# Altium PCB PCB_GTV3.3.PcbDoc (part 7 of 11)
Units mil, origin at the board's own origin, x right, y up, seen from the top; angles counter-clockwise.
Board outline 8070.87 x 4881.89 mil, 4 copper layers (Top Layer, GND, PWR, Bottom Layer), stack 61.653 mil thick; 464 components, 293 nets, 1458 pads, 748 vias.
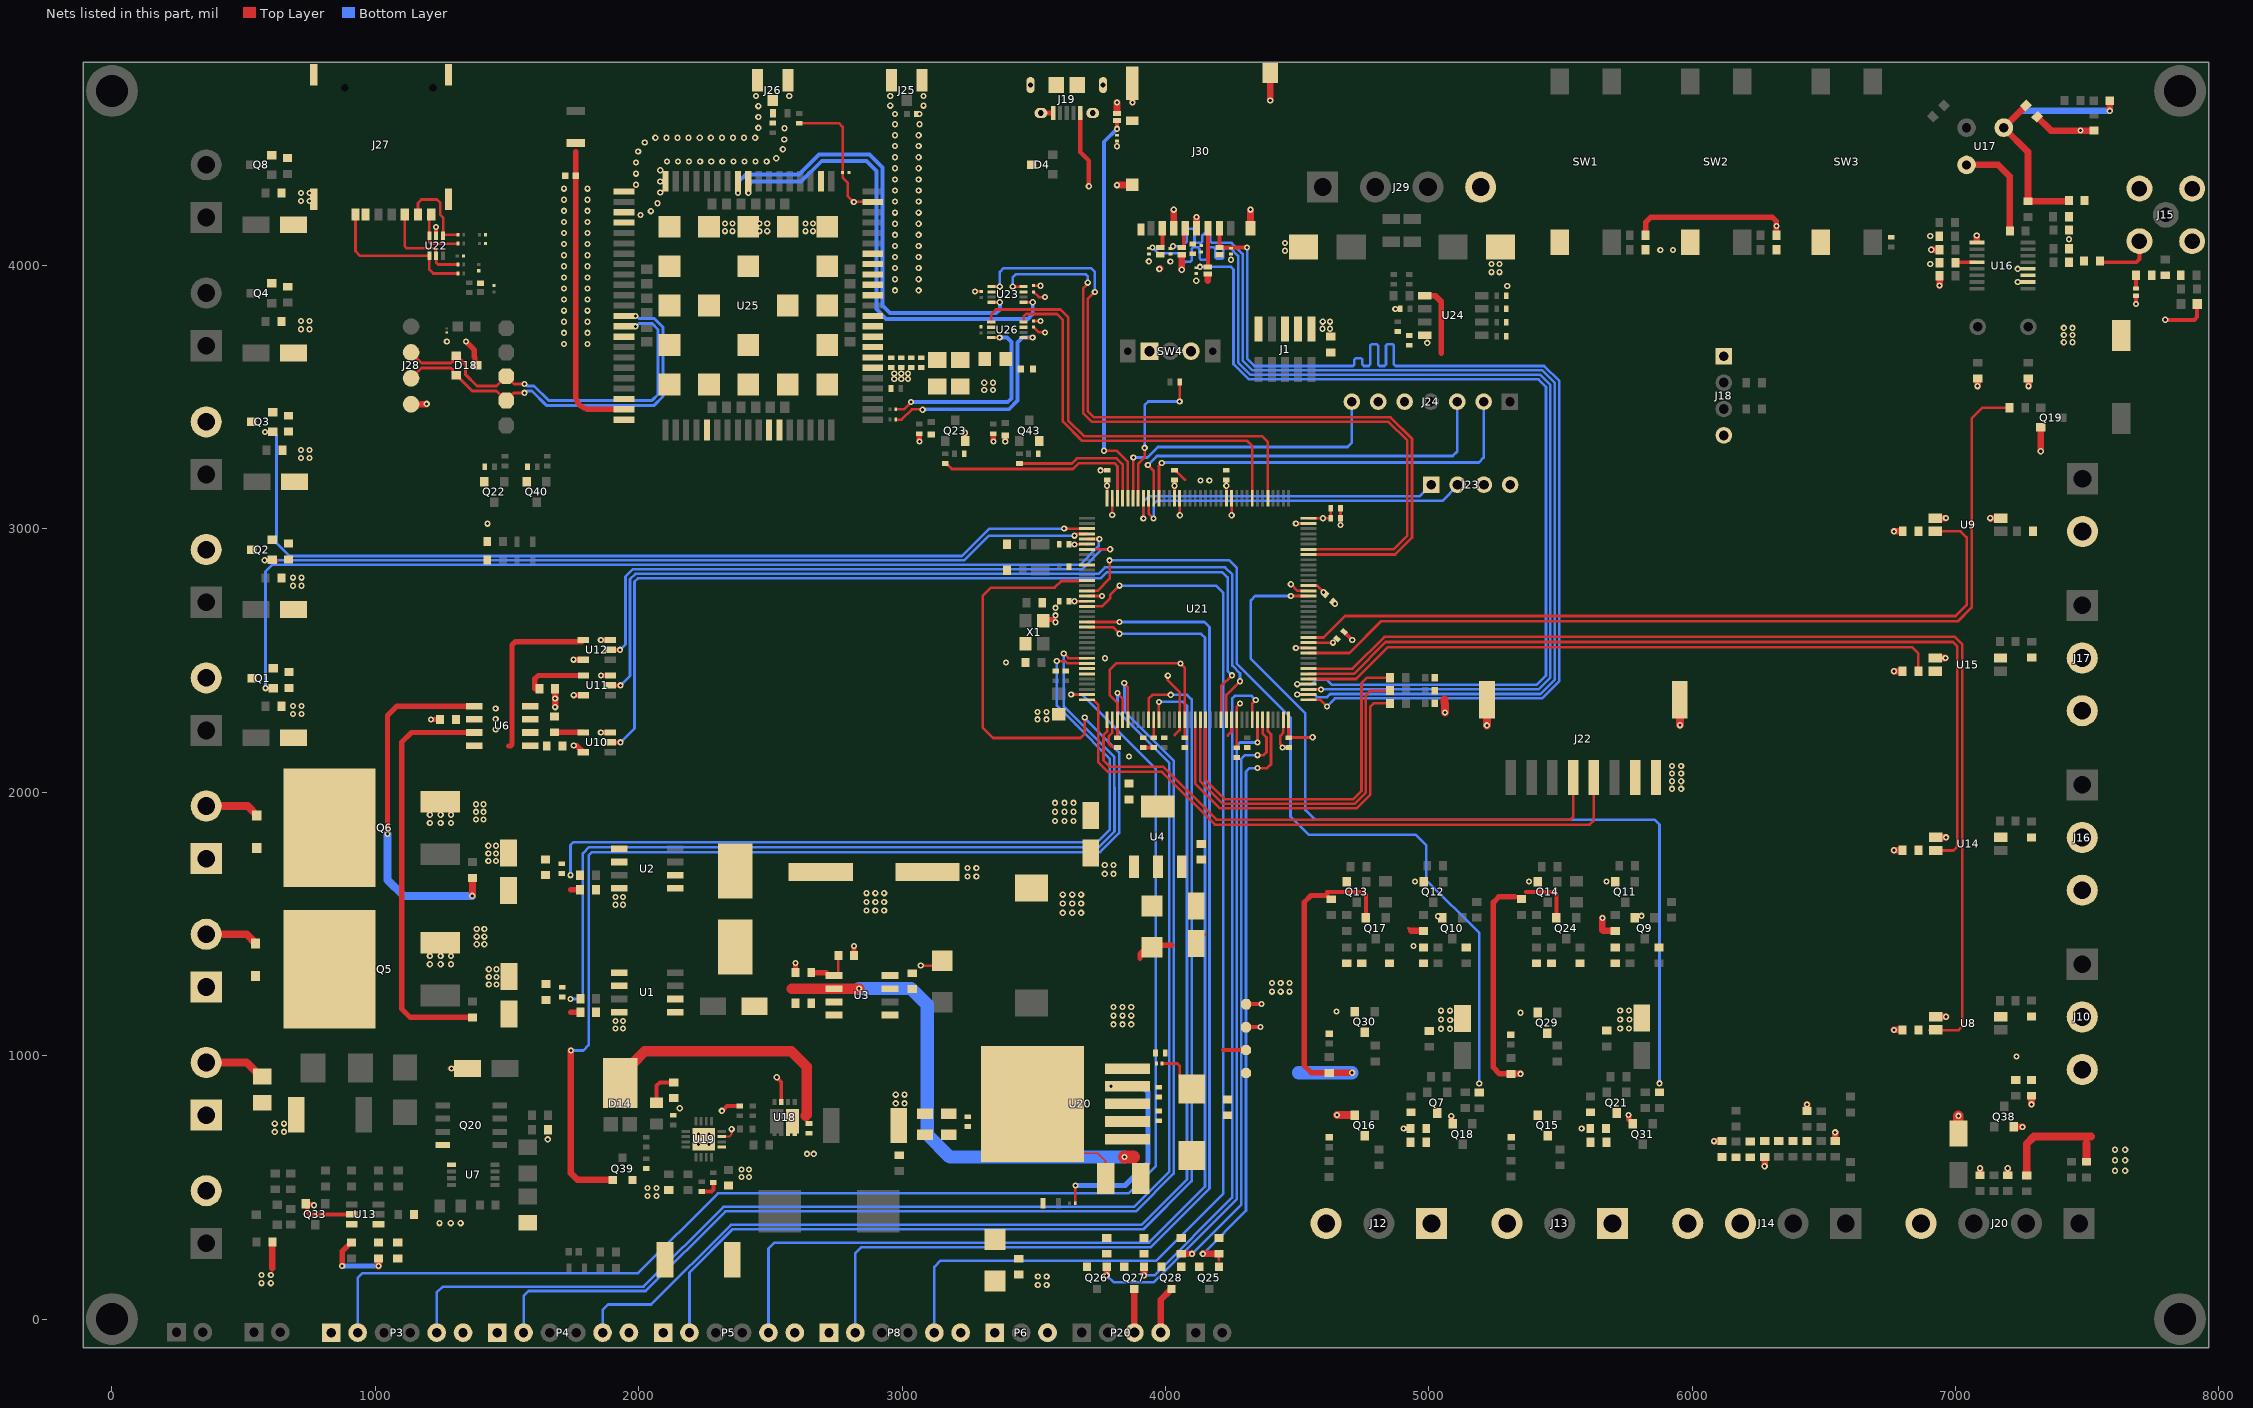
[diagram p5: the nets of this part, all layers, seen from the top]

## Part data (continued)
U3: "1.5-A boost, buck, inverting switching regulator, operation from 0°C to 70°C 8-SOIC 0 to 70", Case/Package=D, Manufacturer="Texas Instruments", Max Input Voltage=40V, Max Operating Temperature=70°C, Max Output Current=750mA, Min Input Voltage=3V, Min Operating Temperature=0°C, Min Output Voltage=1.55V, Output Current=1.5A, Package Quantity=1, Quiescent Current=4mA, Supplier Part Number 1=296-17765-1-ND, Switching Frequency=100kHz, Category="Power Supply Modules", ComponentLink1Description=https://datasheet.ciiva.com/7408/1862376-7408060.pdf?src-supplier=Newark, ComponentLink1URL=https://datasheet.ciiva.com/7408/1862376-7408060.pdf?src-supplier=Newark, ComponentLink2Description=https://datasheet.ciiva.com/2025/mc33063a-2025162.pdf?src-supplier=Digi-Key, ComponentLink2URL=https://datasheet.ciiva.com/2025/mc33063a-2025162.pdf?src-supplier=Digi-Key, ComponentLink3Description=https://datasheet.ciiva.com/2025/mc33063a-2025161.pdf?src-supplier=Digi-Key, ComponentLink3URL=https://datasheet.ciiva.com/2025/mc33063a-2025161.pdf?src-supplier=Digi-Key, ComponentLink4Description=https://datasheet.ciiva.com/2025/mc33063a-2025163.pdf?src-supplier=Digi-Key, ComponentLink4URL=https://datasheet.ciiva.com/2025/mc33063a-2025163.pdf?src-supplier=Digi-Key, Contact Plating=Gold, Lead Free="Lead Free", Manufacturer Part Number=MC34063ADR, Max Output Voltage=40V, Number of Outputs=1, Number of Pins=8, Output Type=Adjustable, Output Voltage=40V, Packaging="Tape and Reel", Pricing 1="1=0.78000, 10=0.68400, 25=0.64240, 100=0.52420, 250=0.48688, 500=0.41438, 1000=0.34206 (USD)", Radiation Hardening=No, REACH SVHC="No SVHC", RoHS=Yes, RoHS Compliant=Yes, Stock 1=17204, Supplier 1=Digi-Key, Synchronous Rectifier=No, Termination=SMD/SMT, Topology=Flyback,SEPIC, Weight=0.002561oz
U4: "IC REG LINEAR 3.3V 1A SOT223", Case/Package=SOT-223, Current Rating=1A, Dropout Voltage=1.2V, Manufacturer="Texas Instruments", Max Input Voltage=15V, Max Operating Temperature=125°C, Min Input Voltage=2.5V, Min Operating Temperature=0°C, Nominal Output Voltage=3.3V, Nominal Supply Current=5mA, Output Voltage Accuracy=1%, Package Quantity=1000, Quiescent Current=10mA, Accuracy=1%, Category="Voltage Regulators - Linear", ComponentLink1Description=https://datasheet.ciiva.com/3225/lms8117a-3225472.pdf?src-supplier=Avnet, ComponentLink1URL=https://datasheet.ciiva.com/3225/lms8117a-3225472.pdf?src-supplier=Avnet, ComponentLink2Description=https://datasheet.ciiva.com/2066/lms8117a-2066594.pdf?src-supplier=Digi-Key, ComponentLink2URL=https://datasheet.ciiva.com/2066/lms8117a-2066594.pdf?src-supplier=Digi-Key, ComponentLink3Description=https://datasheet.ciiva.com/2066/lms8117a-2066595.pdf?src-supplier=Digi-Key, ComponentLink3URL=https://datasheet.ciiva.com/2066/lms8117a-2066595.pdf?src-supplier=Digi-Key, ComponentLink4Description=https://datasheet.ciiva.com/2066/lms8117a-2066596.pdf?src-supplier=Digi-Key, ComponentLink4URL=https://datasheet.ciiva.com/2066/lms8117a-2066596.pdf?src-supplier=Digi-Key, ComponentLink5Description=https://datasheet.ciiva.com/3223/lms8117a-3223813.pdf?src-supplier=Avnet, ComponentLink5URL=https://datasheet.ciiva.com/3223/lms8117a-3223813.pdf?src-supplier=Avnet, ComponentLink6Description=https://datasheet.ciiva.com/25979/lms8117a-25979141.pdf?src-supplier=Avnet+Europe, ComponentLink6URL=https://datasheet.ciiva.com/25979/lms8117a-25979141.pdf?src-supplier=Avnet+Europe, ComponentLink7Description=https://datasheet.ciiva.com/46386/1558097-46386039.pdf?src-supplier=Element14, ComponentLink7URL=https://datasheet.ciiva.com/46386/1558097-46386039.pdf?src-supplier=Element14, ComponentLink8Description=https://datasheet.ciiva.com/8042/90386-8042363.pdf?src-supplier=Element14, ComponentLink8URL=https://datasheet.ciiva.com/8042/90386-8042363.pdf?src-supplier=Element14, ComponentLink9Description=https://datasheet.ciiva.com/5697/1558097-5697692.pdf?src-supplier=Farnell, ComponentLink9URL=https://datasheet.ciiva.com/5697/1558097-5697692.pdf?src-supplier=Farnell, Contact Plating=Tin,Matte, Height=1.6mm, Lead Free="Lead Free", Length=6.5mm, Manufacturer Part Number=LMS8117AMP-3.3/NOPB, Max Output Current=1A, Mount="Surface Mount", Number of Outputs=1, Number of Pins=4, Output Current=1A, Output Type=Fixed, Output Voltage=3.3V, Packaging="Tape and Reel", Polarity=Positive, Pricing 1="1=1.18760, 10=1.01800, 100=0.77540, 250=0.68460, 500=0.64870, 1000=0.59270 (USD)", Radiation Hardening=No, REACH SVHC="No SVHC", RoHS=Yes, RoHS Compliant=Yes, Stock 1=843, Supplier 1="Arrow Electronics", Supplier Part Number 1=LMS8117AMP-3.3/NOPB, Width=3.56mm
U6: "IC GATE DRVR LOW-SIDE 8SOIC", Case/Package=SOIC, Manufacturer="ON Semiconductor", Max Operating Temperature=140°C, Max Output Current=5A, Max Supply Current=3mA, Max Supply Voltage=20V, Min Operating Temperature=-40°C, Min Supply Voltage=4.5V, Supplier Part Number 1=NCP81071ADR2GOSDKR-ND, Category="Gate Drivers", Channel Type=Independent, ComponentLink1Description=https://datasheet.ciiva.com/48511/ncp81071-d-48511319.pdf?src-supplier=Avnet, ComponentLink1URL=https://datasheet.ciiva.com/48511/ncp81071-d-48511319.pdf?src-supplier=Avnet, Height=1.5mm, Lead Free="Lead Free", Length=5mm, Manufacturer Part Number=NCP81071ADR2G, Mount="Surface Mount", Number of Drivers=2, Number of Outputs=2, Number of Pins=8, Packaging="Cut Tape", Pricing 1="1=1.40000, 10=1.25100, 25=1.18720, 100=0.97520, 250=0.91160, 500=0.80560, 1000=0.70000 (USD)", REACH SVHC="No SVHC", RoHS=Yes, RoHS Compliant=Yes, Supplier 1=Digi-Key, Width=4mm
U7: "IC OR CTRLR N+1 8MSOP", Case/Package=MSOP, Manufacturer="Analog Devices / Linear Technology", Max Operating Temperature=70°C, Max Output Current=180mA, Max Supply Voltage=80V, Min Operating Temperature=0°C, Min Supply Voltage=4V, Operating Supply Current=150uA, Package Quantity=50, Supplier Part Number 1=584-LTC4359CMS8#PBF, Category="Power Management ICs", ComponentLink1Description=https://datasheet.ciiva.com/6609/4359fb-6609306.pdf?src-supplier=Digi-Key, ComponentLink1URL=https://datasheet.ciiva.com/6609/4359fb-6609306.pdf?src-supplier=Digi-Key, Lead Free="Lead Free", Manufacturer Part Number=LTC4359CMS8#PBF, Number of Drivers=1, Number of Pins=8, Packaging=Rail/Tube, Pricing 1="1=4.95000, 10=4.44000, 50=4.19000, 100=3.63000, 1000=3.09000, 10000=3.09000 (USD)", RoHS=Yes, Stock 1=57, Supplier 1=Mouser, Turn-Off Delay Time=300ns, Turn-On Delay Time=200us
U8 U9 U14 U15: "TransistorOptocouplers DC 1 2500Vrms SOP-4_P1.27 Optocouplers RoHS", Case/Package=SOIC, Collector Emitter Saturation Voltage=300mV, Forward Voltage=1.2V, Manufacturer=CEL, Max Collector Current=30mA, Max Operating Temperature=100°C, Max Output Voltage=80V, Max Power Dissipation=120mW, Min Operating Temperature=-55°C, Package Quantity=1, Supplier Part Number 1=PS2801C-1-F3-ACT-ND, Collector Emitter Voltage (VCEO)=300mV, ComponentLink1Description=http://www.cel.com/pdf/datasheets/PS2801C-1,PS2801C-4.pdf?src-supplier=Digi-Key, ComponentLink1URL=http://www.cel.com/pdf/datasheets/PS2801C-1,PS2801C-4.pdf?src-supplier=Digi-Key, ComponentLink2Description=http://www.cel.com/pdf/datasheets/how_to_order_optos.pdf?src-supplier=Digi-Key, ComponentLink2URL=http://www.cel.com/pdf/datasheets/how_to_order_optos.pdf?src-supplier=Digi-Key, ComponentLink3Description=http://datasheet.iiic.cc/cel/PS2801C-1-F3-A.pdf?src-supplier=IIIC, ComponentLink3URL=http://datasheet.iiic.cc/cel/PS2801C-1-F3-A.pdf?src-supplier=IIIC, Lead Free="Lead Free", Manufacturer Part Number=PS2801C-1-F3-A, Mount="Surface Mount", Number of Channels=1, Number of Pins=4, Output Current per Channel=30mA, Packaging="Tape and Reel", Pricing 1="1=0.77, 10=0.595, 100=0.3825 (USD)", Stock 1=399, Supplier 1=Digi-Key
U10 U11 U12: "IC BUF NON-INVERT 5.5V SOT23-5", Case/Package=SOT-23-5, High Level Output Current=-8mA, Low Level Output Current=8mA, Manufacturer="Texas Instruments", Max Operating Temperature=125°C, Max Supply Voltage=5.5V, Min Operating Temperature=-40°C, Min Supply Voltage=1.6V, Package Quantity=3000, Quiescent Current=1uA, Supplier Part Number 1=296-37176-6-ND, ComponentLink1Description=http://www.ti.com/lit/pdf/sdyu001?src-supplier=Digi-Key, ComponentLink1URL=http://www.ti.com/lit/pdf/sdyu001?src-supplier=Digi-Key, ComponentLink2Description=http://www.ti.com/lit/ds/symlink/sn74lv1t34.pdf?src-supplier=Avnet, ComponentLink2URL=http://www.ti.com/lit/ds/symlink/sn74lv1t34.pdf?src-supplier=Avnet, Lead Free="Lead Free", Logic Function=Buffer,Inverting, Manufacturer Part Number=SN74LV1T34DBVR, Mount="Surface Mount", Number of Bits=1, Number of Bits per Element=1, Number of Channels=1, Number of Elements=1, Number of Input Lines=1, Number of Inputs=1, Number of Output Lines=1, Number of Outputs=1, Number of Pins=5, Operating Supply Current=8mA, Packaging="Tape and Reel", Polarity=Non-Inverting, Pricing 1="1=0.43, 10=0.349, 25=0.3192, 100=0.2374, 250=0.2152, 500=0.17808, 1000=0.13356 (USD)", Propagation Delay=15.5ns, Radiation Hardening=No, REACH SVHC="No SVHC", RoHS Compliant=Yes, Stock 1=37360, Supplier 1=Digi-Key, Weight=0.000353oz
U13: "SOT-23-6 Comparators ROHS", Case/Package=SOT, Manufacturer="Texas Instruments", Max Operating Temperature=125°C, Max Supply Voltage=18V, Min Operating Temperature=-40°C, Min Supply Voltage=1.8V, Nominal Supply Current=7uA, Number of Voltages Monitored=2, Operating Supply Current=5.5uA, Package Quantity=3000, Quiescent Current=11uA, Supplier Part Number 1=595-TPS3700DDCR, Undervoltage Threshold=1.7V, Category=Comparators, ComponentLink1Description=https://datasheet.ciiva.com/15106/getdatasheetpartid-496993-15106246.pdf?src-supplier=Verical, ComponentLink1URL=https://datasheet.ciiva.com/15106/getdatasheetpartid-496993-15106246.pdf?src-supplier=Verical, ComponentLink2Description=https://datasheet.ciiva.com/22693/1882693-22693543.pdf?src-supplier=Element14, ComponentLink2URL=https://datasheet.ciiva.com/22693/1882693-22693543.pdf?src-supplier=Element14, ComponentLink3Description=https://datasheet.ciiva.com/6625/tps3700-6625126.pdf?src-supplier=Digi-Key, ComponentLink3URL=https://datasheet.ciiva.com/6625/tps3700-6625126.pdf?src-supplier=Digi-Key, ComponentLink4Description=https://datasheet.ciiva.com/6625/tps3700-6625125.pdf?src-supplier=Digi-Key, ComponentLink4URL=https://datasheet.ciiva.com/6625/tps3700-6625125.pdf?src-supplier=Digi-Key, ComponentLink5Description=https://datasheet.ciiva.com/6625/tps3700-6625129.pdf?src-supplier=Digi-Key, ComponentLink5URL=https://datasheet.ciiva.com/6625/tps3700-6625129.pdf?src-supplier=Digi-Key, ComponentLink6Description=https://datasheet.ciiva.com/14204/tps3700-14204199.pdf?src-supplier=Avnet, ComponentLink6URL=https://datasheet.ciiva.com/14204/tps3700-14204199.pdf?src-supplier=Avnet, Hysteresis=5.5mV, Lead Free="Lead Free", Manufacturer Part Number=TPS3700DDCR, Mount="Surface Mount", Number of Channels=1, Number of Elements=2, Number of Pins=6, Packaging="Tape and Reel", Pricing 1="1=2.75000, 10=2.48000, 25=2.34000, 50=2.34000, 100=2.00000, 250=1.87000, 500=1.64000, 1000=1.36000, 3000=1.35000, 10000=1.35000 (USD)", Propagation Delay=29us, Radiation Hardening=No, REACH SVHC="No SVHC", RoHS=Yes, RoHS Compliant=Yes, Series=TPS3700, Supplier 1=Mouser, Supply Current=7uA, Watchdog Timer=No
U16: "RF RX ASK/OOK 300-450MHZ 16QSOP", Case/Package=QSOP, Current - Receiving=6mA, Frequency=450MHz, Manufacturer=Microchip, Max Operating Temperature=105°C, Max Supply Voltage=3.6V, Min Frequency=300MHz, Min Operating Temperature=-40°C, Min Supply Voltage=3V, Nominal Supply Current=4.3mA, Operating Frequency="300 MHz to 450 MHz", Package Quantity=98, Bandwidth=330kHz, Category="Interface ICs", ComponentLink1Description=https://datasheet.ciiva.com/2798/micrf220-2798468.pdf?src-supplier=Digi-Key, ComponentLink1URL=https://datasheet.ciiva.com/2798/micrf220-2798468.pdf?src-supplier=Digi-Key, ComponentLink2Description=https://datasheet.ciiva.com/30475/0900766b81133813-30475820.pdf?src-supplier=RSComponents, ComponentLink2URL=https://datasheet.ciiva.com/30475/0900766b81133813-30475820.pdf?src-supplier=RSComponents, ComponentLink3Description=https://datasheet.ciiva.com/1164/micrf220-1164232.pdf?src-supplier=Element14, ComponentLink3URL=https://datasheet.ciiva.com/1164/micrf220-1164232.pdf?src-supplier=Element14, Data Rate=20Kbps, Depth=3.91mm, Height=1.47mm, Lead Free="Lead Free", Length=4.9mm, Manufacturer Part Number=MICRF220AYQS, Max Frequency=450MHz, Mount="Surface Mount", Number of Pins=16, Packaging=Rail/Tube, Pricing 1="1=2.15000 (USD)", Radiation Hardening=No, REACH SVHC="No SVHC", RoHS=Yes, RoHS Compliant=Yes, Sensitivity=-112.5dBm, Series=QwikRadio®, Stock 1=5131, Supplier 1="Arrow Electronics", Supplier Part Number 1=MICRF220AYQS, Supply Current=4.3mA, Width=3.91mm
U17: "Through Hole Biometric Sensors ROHS", Manufacturer=Senba, ComponentLink1Description=LCSC, ComponentLink1URL=https://www.lcsc.com/product-detail/Biometric-Sensors_Senba-Sensing-Tech-AS312_C90465.html, Manufacturer Part Number=AS312
U18: "40V 20A 17mΩ@10V,10A 21W 1.6V@250uA 72pF@20V 2 N-Channel 1.05nF@20V 11nC@10V +150℃@(Tj) PDFN3x3", Manufacturer="ALLPOWER(ShenZhen Quan Li Semiconductor)", ComponentLink1Description=LCSC, ComponentLink1URL=https://lcsc.com/product-detail/MOSFETs_ALLPOWER-ShenZhen-Quan-Li-Semiconductor-AP4008QD_C2828588.html, Manufacturer Part Number=AP4008QD
U19: "IC BATT CHG MULTI-CHEM 16VQFN", LCSC Part Number=C53712, Manufacturer="Texas Instruments", Category="Battery Management", ComponentLink1Description=https://datasheet.ciiva.com/15115/getdatasheetpartid-517726-15115144.pdf?src-supplier=Verical, ComponentLink1URL=https://datasheet.ciiva.com/15115/getdatasheetpartid-517726-15115144.pdf?src-supplier=Verical, ComponentLink2Description=https://datasheet.ciiva.com/1934/bq24650-1934895.pdf?src-supplier=Digi-Key, ComponentLink2URL=https://datasheet.ciiva.com/1934/bq24650-1934895.pdf?src-supplier=Digi-Key, ComponentLink3Description=https://datasheet.ciiva.com/3214/bq24650-3214319.pdf?src-supplier=Avnet, ComponentLink3URL=https://datasheet.ciiva.com/3214/bq24650-3214319.pdf?src-supplier=Avnet, Item Type=IC, Manufacturer Part Number=BQ24650RVAR, Pricing 1="1=4.95, 10=4.442, 25=4.1996, 100=3.6396, 250=3.453, 500=3.09836, 1000=2.61307 (USD)", RoHS=Yes, Stock 1=8347, Supplier 1=Digi-Key
U20: "IC REG LDO ADJ 3A TO263-5", Case/Package=TO-263, Dropout Voltage=370mV, Input Bias Current=40nA, LCSC Part Number=C11149, Manufacturer=Microchip, Max Input Voltage=26V, Max Operating Temperature=125°C, Max Output Current=3A, Max Output Voltage=25V, Min Input Voltage=2.5V, Min Operating Temperature=-40°C, Min Output Voltage=1.25V, Package Quantity=750, Quiescent Current=35mA, Reference Voltage=1.24V, Supplier Part Number 1=3153683, Accuracy=1%, Category="Voltage Regulators - Linear", ComponentLink1Description=https://datasheet.ciiva.com/23772/1572633-23772885.pdf?src-supplier=Newark, ComponentLink1URL=https://datasheet.ciiva.com/23772/1572633-23772885.pdf?src-supplier=Newark, ComponentLink2Description=https://datasheet.ciiva.com/16296/mic29150-16296190.pdf?src-supplier=Future+Electronics, ComponentLink2URL=https://datasheet.ciiva.com/16296/mic29150-16296190.pdf?src-supplier=Future+Electronics, ComponentLink3Description=https://datasheet.ciiva.com/15200/getdatasheetpartid-143209-15200663.pdf?src-supplier=Verical, ComponentLink3URL=https://datasheet.ciiva.com/15200/getdatasheetpartid-143209-15200663.pdf?src-supplier=Verical, Height=4.59mm, Item Type=IC, Lead Free="Lead Free", Length=10.67mm, Manufacturer Part Number=MIC29302WU-TR, Mount="Surface Mount", Number of Outputs=1, Number of Pins=5, Number of Regulators=1, Output Configuration=Positive, Output Current=3A, Output Type=Adjustable, Output Voltage=26V, Packaging="Tape and Reel", Polarity=Positive, Pricing 1="750=2.12000, 1500=2.09000, 2250=2.07000, 3000=2.06000, 3750=2.02000 (USD)", Radiation Hardening=No, Reach SVHC Compliant=Yes, RoHS=Yes, RoHS Compliant=Yes, Series=-, Supplier 1="Future Electronics", Width=9.17mm
U21: "IC MCU 32BIT 1MB FLASH 144LQFP", Case/Package=LQFP, Clock Frequency=72MHz, LCSC Part Number=C44011, Max Operating Temperature=85°C, Max Power Dissipation=666mW, Max Supply Voltage=3.6V, Min Operating Temperature=-40°C, Min Supply Voltage=2V, Nominal Supply Current=1.9uA, Package Quantity=60, Supplier Part Number=511-STM32F103ZGT6, Category=Microcontrollers, ComponentLink1Description=LCSC, ComponentLink2Description=https://datasheet.ciiva.com/4841/cd00253742-490410-4841544.pdf?src-supplier=Mouser, ComponentLink2URL=https://datasheet.ciiva.com/4841/cd00253742-490410-4841544.pdf?src-supplier=Mouser, ComponentLink3Description=https://datasheet.ciiva.com/5752/cd00253742-5752891.pdf?src-supplier=Farnell, ComponentLink3URL=https://datasheet.ciiva.com/5752/cd00253742-5752891.pdf?src-supplier=Farnell, Core Architecture=ARM, Data Bus Width=32b, Frequency=72MHz, Height=1.45mm, Interface=I2C,SPI,USB,CAN,IrDA,UART,USART,LIN,I2S, Item Type=IC, Lead Free="Lead Free", Length=20.2mm, Memory Format=FLASH, Memory Size=1MB, Number of A/D Converters=3NUMBER, Number of ADC Channels=21, Number of D/A Converters=2NUMBER, Number of I2C Channels=2, Number of I/Os=112, Number of Programmable I/O=112, Number of PWM Channels=6, Number of SPI Channels=3, Number of Timers/Counters=14, Oscillator Type=Internal, Packaging=Tray, Peripherals="POR,PWM,WDT,DMA,Temp Sensor,I2C", Pins=144, Pricing="1=13.7, 10=12.83, 50=11.16, 100=9.99, 1000=8.77, 10000=8.77 (USD)", Radiation Hardening=No, RAM Size=96KB, Reach SVHC Compliant=No, RoHS=Yes, RoHS Compliant=Yes, Series="STM32 F1", Stock=8305, Supplier=Mouser, Watchdog Timer=Yes, Width=20.2mm
U22: "15V 5 Unidirectional 5V SOT-363 ESD Protection Devices ROHS", LCSC Part Number=C5180312, Manufacturer=ElecSuper, Package=SOT-363, ComponentLink1Description=LCSC, ComponentLink1URL=https://www.lcsc.com/product-detail/ESD-Protection-Devices_ElecSuper-SMF05CT1G-ES_C5180312.html, Item Type="ESD Diode", Manufacturer Part Number=SMF05CT1G-ES
U23 U26: "IC TRNSLTR BIDIRECTIONAL US8", Case/Package=VSSOP, High Level Output Current=-20uA, Low Level Output Current=20uA, Manufacturer="Texas Instruments", Max Operating Temperature=85°C, Max Supply Voltage=5.5V, Min Operating Temperature=-40°C, Min Supply Voltage=1.65V, Output Current=50mA, Package Quantity=1, Category="Integrated Circuits (ICs)", ComponentLink1Description=https://datasheet.ciiva.com/4226/sces641b-4226901.pdf?src-supplier=Arrow+Electronics, ComponentLink1URL=https://datasheet.ciiva.com/4226/sces641b-4226901.pdf?src-supplier=Arrow+Electronics, ComponentLink2Description=https://datasheet.ciiva.com/15096/getdatasheetpartid-226009-15096242.pdf?src-supplier=Verical, ComponentLink2URL=https://datasheet.ciiva.com/15096/getdatasheetpartid-226009-15096242.pdf?src-supplier=Verical, ComponentLink3Description=https://datasheet.ciiva.com/14287/txb0102-14287498.pdf?src-supplier=Avnet, ComponentLink3URL=https://datasheet.ciiva.com/14287/txb0102-14287498.pdf?src-supplier=Avnet, ComponentLink4Description=https://datasheet.ciiva.com/14287/txb0102-14287370.pdf?src-supplier=Avnet, ComponentLink4URL=https://datasheet.ciiva.com/14287/txb0102-14287370.pdf?src-supplier=Avnet, ComponentLink5Description=https://datasheet.ciiva.com/6619/txb0102-6619255.pdf?src-supplier=Digi-Key, ComponentLink5URL=https://datasheet.ciiva.com/6619/txb0102-6619255.pdf?src-supplier=Digi-Key, ComponentLink6Description=https://datasheet.ciiva.com/6619/txb0102-6619256.pdf?src-supplier=Digi-Key, ComponentLink6URL=https://datasheet.ciiva.com/6619/txb0102-6619256.pdf?src-supplier=Digi-Key, ComponentLink7Description=https://datasheet.ciiva.com/6619/txb0102-6619257.pdf?src-supplier=Digi-Key, ComponentLink7URL=https://datasheet.ciiva.com/6619/txb0102-6619257.pdf?src-supplier=Digi-Key, Contact Plating=Gold, Data Rate=100Mbps, Height=0.85mm, Lead Free="Lead Free", Length=2.3mm, Logic Function=Translator, Manufacturer Part Number=TXB0102DCUT, Mount="Surface Mount", Number of Bits=2, Number of Channels=2, Number of Inputs=2, Number of Pins=8, Output Type=3-STATE, Packaging="Tape and Reel", Pricing 1="1=0.79330, 10=0.66470, 25=0.65820, 250=0.37450, 500=0.36200, 1000=0.29770, 2500=0.28440 (USD)", Propagation Delay=31ns, Radiation Hardening=No, REACH SVHC="No SVHC", RoHS=Yes, RoHS Compliant=Yes, Series=-, Stock 1=10, Supplier 1="Arrow Electronics", Supplier Part Number 1=TXB0102DCUT, Turn-On Delay Time=7.4ns, Weight=0.000339oz, Width=2mm
U24: "SOP-8 RS-485/RS-422 ICs ROHS", LCSC Part Number=C519086, Manufacturer=HGSEMI, Package=SOP-8, ComponentLink1Description=LCSC, ComponentLink1URL=https://www.lcsc.com/product-detail/RS-485-RS-422-ICs_HGSEMI-SP3485EIM-TR_C519086.html, Item Type=IC, Manufacturer Part Number=SP3485EIM/TR
U25: "RF TXRX MODULE CELLULAR SMD", Manufacturer="SIMCom Wireless Solutions Limited", Package="80-SMD Module", ComponentLink1Description=Digikey, ComponentLink1URL=https://www.digikey.com/en/products/detail/simcom-wireless-solutions-limited/A7672E-FASE/15841437, Item Type="IC Module", Manufacturer Part Number="A7672E (FASE)"
X1: library part XC32M4-8.000-F18LJDT, "8MHz SMD Crystal Resonator 18pF 200Ω ±20ppm ±30ppm -40℃~+85℃ SMD3225-4P Crystals ROHS", Manufacturer=HCI, ComponentLink1Description=LCSC, ComponentLink1URL=https://www.lcsc.com/product-detail/Crystals_HCI-XC32M4-8-000-F18LJDT_C2905353.html, Manufacturer Part Number=XC32M4-8.000-F18LJDT
X2: library part S1C13523ZWFAC, "13.52313MHz In-line passive crystal oscillator 20pF 60Ω ±20ppm ±30ppm -40℃~+85℃ HC-49S-2P Crystals ROHS", LCSC Part Number=C2681243, Manufacturer=JYJE, Package=HC-49S-2P, ComponentLink1Description=LCSC, ComponentLink1URL=https://www.lcsc.com/product-detail/Crystals_JYJE-S1C13523ZWFAC_C2681243.html, Manufacturer Part Number=S1C13523ZWFAC
X3: library part X321532768KGD2SI, "32.768kHz SMD Crystal Resonator 12.5pF ±20ppm -40℃~+85℃ SMD3215-2P Crystals ROHS", Manufacturer="Yangxing Tech", ComponentLink1Description=LCSC, ComponentLink1URL=https://www.lcsc.com/product-detail/Crystals_Yangxing-Tech-X321532768KGD2SI_C620155.html, Manufacturer Part Number=X321532768KGD2SI

## Free pads (board coordinates)
  round 196.85 hole 122.05: MH1(0,0) MH1(0.1,4663.13) MH1(7852.11,-0.1) MH1(7852.21,4663.03)

## Via types
v1: diameter 23.62, hole 11.81, Top Layer to Bottom Layer, tented both sides, 422 vias
v2: diameter 23.62, hole 11.81, Top Layer to Bottom Layer, 326 vias

## Nets (pads, with @x,y where several pads share a name; then routed paths per layer and width w, separated by ;. In a path a pad name is that pad's centre, name@x,y a point inside that pad or via, vN(x,y) a via of type N, cw(c..) or ccw(c..) an arc to the next point about the centre after c; other vN are vias at no path point)
0-10V: R112.1 SB36.1
2V8: C10.1 R143.1 U25.99 | length 523.7
  Top Layer w10: R143.1@2609,4540.54 2759.92,4540.54 2774.27,4526.19 C10.1@2774.27,4353.28 2774.27,4333.85 2793.26,4314.85 2793.26,4264.08 2815.61,4241.74 U25.99@2866.48,4241.74
  other v1: 2816.81,4241.74
3V3: C5.2 C12.1 C23.1 C26.1 C29.1 C30.1 C31.1 C32.1 C33.1 C39.1 C48.1 C49.1 C51.1 C52.1 C75.2 C76.1 C93.1 C95.1 C104.1 C106.1 C107.2 C108.2 C109.1 C110.1 C111.1 C112.1 C114.1 D3.2 J1.1 J24.5 J30.4 L1.1 LED1.1 LED2.1 LED3.1 LED8.1 LS1.1 P1.1 P3.1 P4.1 P5.1 P6.1 P8.1 Q17.2 Q24.2 R18.2 R19.2 R20.2 R23.2 R31.1 R35.2 R43.2 R45.2 R48.2 R49.2 R54.2 R55.2 R57.2 R58.2 R59.2 R60.2 R76.2 R79.2 R93.2 R94.2 R104.2 R106.1 R156.2 R157.2 R158.2 R159.2 R160.2 SW4.1 U4.2 U4.4 U17.1 U21.6 U21.17 U21.39 U21.52 U21.62 U21.72 U21.84 U21.95 U21.108 U21.121 U21.131 U21.144 U23.7 U24.8 U26.7 | length 6364.7
  Top Layer w7: LED8.1@7584.51,4626.4 LED8.1@7585.11,4627
  Top Layer w10: C106.1@3499,3766.19 3519,3746.19 v1(3542.99,3746.19) ; C104.1@3499,3900.19 3519,3880.19 v1(3542.99,3880.19) ; v1(3655.01,2725.56) U21.17@3702.4,2725.56 ; v1(3655.04,2940.73) 3656.41,2942.1 3671.69,2942.1 ; U21.6@3701.88,2941.59 U21.6@3702.4,2942.1 ; U21.144@3778.38,3116.51 v1(3778.38,3163.89) ; C30.1@3817.75,2207.5 U21.39@3817.75,2275.56 3817.75,2338.9 3788.03,2368.62 3788.03,2464.64 3812.73,2489.34 v1(4056.87,2489.34) 4073.66,2472.56 U21.52@4073.66,2275.56 C29.1@4073.66,2207.5 ; U21.131@4034.28,3116.51 v1(4034.28,3163.89) ; U21.121@4231.14,3116.51 v1(4231.14,3163.89) ; C12.1@4270.51,2169.01 U21.62@4270.51,2275.56 4270.51,2324.7 4283.01,2337.2 v1(4283.01,2337.37) ; U21.72@4467.36,2275.56 C31.1@4467.36,2207.5 4468.11,2208.25 4558.25,2208.25 v1(4559,2209) ; U21.84@4543.34,2568.08 v1(4636.26,2568.08) v1@4637.31,2568.08 ; U21.95@4543.34,2784.62 4543.85,2784.11 4577.36,2784.11 4600.51,2760.95 v1(4600.51,2759.42) ; U21.108@4543.34,3040.52 v1(4598,3040.52) C93.1@4627.5,3040.52 C112.1@4627.5,3079 ; 4613.99,1621.03 4613.99,1609.92 R48.2@4629.87,1594.03 ; R94.2@4621.79,935.03 R94.2@4622.79,936.03 ; C32.1@4650.42,2581.2 C32.1@4651.47,2581.2 ; v1@4872.81,3835.32 4891.34,3835.32 R106.1@4891.53,3835.51 R106.1@4891.92,3835.13 ; 4921.87,1484.03 4931.87,1474.03 4932.93,1474.03 ; C76.1@7266.97,4607.59 C76.1@7268.19,4607.59
  Top Layer w15: P1.1@4306,1196 v1(4365,1196) ; 4613.99,1621.03 4749.29,1621.03 4761.01,1609.32 Q17.2@4761.01,1522.93 ; 5367.92,1621.8 5471.99,1621.8 5484.47,1609.32 Q24.2@5484.47,1522.93
  Top Layer w20: R48.2@4613.12,1608.57 4552.82,1608.57 4526.87,1582.61 4526.87,962.04 4553.87,935.03 R94.2@4621.79,935.03 ; R93.2@5311.87,931.03 5268.97,931.03 5244.88,955.12 5244.88,1582.33 5265.66,1603.12 5327.12,1603.12 ; R18.2@5823.87,4115.3 5823.87,4165.03 5841.87,4183.03 6304.87,4183.03 6319.27,4168.63 R19.2@6319.27,4115.3 ; R23.2@6798.44,2459.75 R23.2@6801.31,2459.75
  Top Layer w25: J30.4@4117.88,4141 v1@4117.88,4183.73 ; R94.2@4622.79,936.03 4623.79,935.03 v2(4708.87,935.03) ; 4932.93,1474.03 R45.2@4979.84,1474.03 ; R93.2@5311.87,931.03 v2(5347.87,931.03) ; v1(5659,1522.93) 5659.15,1522.77 5659.15,1476.53 5661.65,1474.03 R43.2@5707.87,1474.03 ; v2(6765.84,1097.92) R76.2@6798.44,1097.92 ; v2(6765.84,1779.92) R35.2@6798.44,1779.92 ; v2(6765.84,2459.75) R23.2@6798.44,2459.75 ; v2(6765.87,2990.92) R79.2@6799.23,2990.92 ; v2(6907.53,4060.03) R55.2@6938.87,4060.03 ; C76.1@7266.8,4607.56 7182.98,4523.74 U17.1@7182.98,4523.4 7274.87,4431.51 C75.2@7274.87,4244.03 7274.87,4243.53 R54.2@7429.87,4243.53 ; v1(7585.11,4587.53) LED8.1@7585.11,4627
  Top Layer w30: 5059.27,2352.21 5059.27,2338.03 5061.87,2335.44 v2(5061.87,2303.03)
  Bottom Layer w25: U17.1@7182.98,4523.4 7247.12,4587.53 v1(7585.11,4587.53)
  Bottom Layer w50: 4505,935.03 v2(4708.87,935.03)
  other v1: 4942,1417 3581,1891 3617,1891 3651,1891 3581,1926 3617,1926 3651,1926 3581,1960 3617,1960 3651,1960 4872.81,3835.51 4117,3942.3 3936.92,4016 4018.54,4015.78 4248.31,4021.89 4117.61,4184 3816,4453
  other v2: 3515.5,129 3549,129 3515.5,162 3549,162 7231.61,996.57 4404,1243 4437.5,1243 4471,1243 4404,1276 4437.5,1276 4471,1276 3514.5,2277 3548,2277 3514.5,2305 3548,2305 4993.87,3706.56 7411,3709 7444,3709 7411,3736.16 7444,3736.16 4596.31,3760.17 4624.52,3760.17 7411,3763.5 7444,3763.5 4597,3787 4625.2,3787 5297.87,3922.03 6319.87,4150.03
3V3#: C50.1 R54.1 SB17.1
4-20mA: R103.1 R110.1 SB35.1
5V: C4.1 C6.1 C16.1 C17.1 C18.1 C21.1 C22.1 C55.1 D2.1 J18.4 J19.1 J23.4 L2.2 P7.1 R1.1 R21.2 R85.2 SB43.1 U1.8 U2.8 U4.3 U6.6 U10.5 U11.5 U12.5 | length 950
  Top Layer w10: R21.2@7269.98,545.4 R21.2@7270.34,545.03
  Top Layer w15: P7.1@4305.75,1108.68 v1(4360.75,1108.68)
  Top Layer w16: J19.1@3676.57,4579.07 3676.57,4430.48 3709,4398.05 v2(3709,4301)
  Top Layer w20: v2(1752.87,2503.66) U12.5@1790.1,2503.66 ; v2(1753.28,2178.04) 1764.51,2178.04 U10.5@1790.1,2152.45 ; v2(1753.28,2368.81) U11.5@1790.51,2368.81 ; R1.1@2817.87,1380.03 v1(2817.87,1416.67)
  Top Layer w30: R21.2@7269.98,545.4 7269.98,665.27 7298.06,693.35 7514,693.35 ; SB43.1@7496.98,597.4 7496.98,666.28
  other v1: 7605,563 7643.87,563 7605,603 7643.87,603 7605,643 7643.87,643 3610.05,1542.35 3646.05,1542.35 3680.05,1542.35 3610.05,1577.35 3646.05,1577.35 3680.05,1577.35 3610.05,1611.35 3646.05,1611.35 3680.05,1611.35 1457,2238 1457,2278 1457,2318
  other v2: 1912,1103.07 1940.83,1103.07 1912,1132 1940.83,1132 1912,1573.07 1940.83,1573.07 1912,1602 1940.83,1602 3248.5,1680 3282,1680 3248.5,1713 3282,1713
#SIM_CD: J27.CD R152.1 U22.4 | length 594.5
  Top Layer w10: J27.CD@924.53,4193.9 924.53,4054.37 942.06,4036.85 U22.4@1205.28,4036.85 1205.28,3984.7 1219.95,3970.03 R152.1@1314.03,3970.03
#SIM_CLK: J27.C3 R151.1 U22.3 | length 215.2
  Top Layer w7: U22.3@1205.22,4113.17 U22.3@1205.28,4113.22
  Top Layer w10: J27.C3@1204.06,4181.03 1204.06,4114.44 U22.3@1205.28,4113.22 ; J27.C3@1204.06,4186.03 J27.C3@1211.93,4193.9 ; U22.3@1205.22,4113.17 1205.22,4088.33 1210.15,4083.41 R151.1@1314.03,4083.41
#SIM_DATA: J27.C7 R153.1 U22.1 | length 324.5
  Top Layer w7: U22.1@1257.85,4114.61 U22.1@1260.36,4117.12
  Top Layer w10: J27.C7@1161.93,4193.9 1161.93,4237.67 1174.87,4250.61 1234.29,4250.61 1245.94,4238.96 1245.94,4193.95 1257.85,4182.05 U22.1@1257.85,4114.61 ; U22.1@1260.36,4117.12 R153.1@1314.03,4117.12
#SIM_RST: J27.C2 R150.1 U22.5 | length 374.7
  Top Layer w10: J27.C2@1111.93,4188.9 1111.93,4072.65 1118.59,4065.99 1223.46,4065.99 1229.32,4060.14 1229.32,4038.39 U22.5@1230.87,4036.85 1230.87,4011.03 1238.15,4003.75 R150.1@1314.03,4003.75
_ADC: C36.1 R12.1 R13.1 U21.46 | length 68.1
  Top Layer w10: R13.1@3955.54,2207.5 U21.46@3955.54,2275.56
ADC_14: P4.2 U21.41 | length 4884.8
  Top Layer w10: v1(3843.64,2415.05) 3843.64,2411.36 3857.12,2397.89 U21.41@3857.12,2275.56
  Bottom Layer w10: P4.2@1562.87,-51.43 1562.87,87.03 1582.18,106.35 2026.06,106.35 2328.74,409.03 3888.08,409.03 4030.87,551.83 4030.87,2119.87 3844.49,2306.25 3844.49,2414.2 v1(3843.64,2415.05)
ADC_15: P4.5 U21.47 | length 4488.5
  Top Layer w10: v1(3975.11,2343.38) v1(3975.11,2343.38) 3975.17,2275.62 U21.47@3975.23,2275.56
  Bottom Layer w10: P4.5@1862.87,-51.43 1862.87,34.04 1884.18,55.35 2047.18,55.35 2349.87,358.03 3909.2,358.03 4081.87,530.7 4081.87,2128 4081.87,2328 4066.49,2343.38 v1(3975.11,2343.38)
ADJ: R130.1 R133.2 U20.5
AGND: C86.1 Q39.2 R124.2 R125.1 R129.1 R148.1 U19.17 | length 74.4
  Top Layer w15: C86.1@2238.63,484.67 2276.68,484.67 2283.66,491.65 R129.1@2283.66,518.17
  other v2: 2032.87,467.03 2067.87,467.03 2032.87,498.03 2067.87,498.03
AN1: P8.2 U21.21 | length 4352.6
  Top Layer w10: U21.21@3702.4,2646.82 v1(3826,2646.82)
  Bottom Layer w10: P8.2@2822.37,-51.43 2822.37,250.4 2845,273.03 3944.41,273.03 4167.22,495.85 4167.22,2128 4167.22,2627.15 4147.55,2646.82 v1(3826,2646.82)
AN2: P8.5 U21.18 | length 4310.6
  Top Layer w10: U21.18@3702.4,2705.88 3759.39,2705.88 3789.98,2736.47 3789.98,2748.6 v1(3826,2784.62)
  Bottom Layer w10: P8.5@3122.37,-51.43 3122.37,197.7 3146.7,222.03 3965.53,222.03 4218.87,475.37 4218.87,2128 4218.87,2758.13 4192.38,2784.62 v1(3826,2784.62)
AN10: P3.2 U21.35 | length 5420.4
  Top Layer w10: v1(3642,2371) 3642.12,2371.12 3702.28,2371.12 U21.35@3702.4,2371.23
  Bottom Layer w10: P3.2@933.12,-51.43 933.12,155.29 952.18,174.35 1997.89,174.35 2300.58,477.03 3859.91,477.03 3962.87,579.99 3962.87,2090.49 3682.36,2371 v1(3642,2371)
AN11: P3.5 U21.40 | length 5131.2
  Top Layer w10: v1(3817.68,2376.89) v1(3817.68,2376.89) 3837.43,2357.06 U21.40@3837.43,2275.56
  Bottom Layer w10: P3.5@1233.12,-51.43 1233.12,100.29 1256.18,123.35 2019.01,123.35 2321.7,426.03 3881.03,426.03 4013.87,558.87 4013.87,2112.83 3817.79,2308.91 3817.79,2376.78 v1(3817.68,2376.89)
AN12: P5.2 U21.45 | length 4364.3
  Top Layer w10: U21.45@3935.86,2275.56 3935.86,2355.83 3950.22,2370.19 v1(4020.11,2370.19)
  Bottom Layer w10: P5.2@2192.62,-51.43 2192.62,176.74 2356.91,341.03 3916.24,341.03 4099.22,524.01 4099.22,2128 4099.22,2352.98 4082.01,2370.19 v1(4020.11,2370.19)
AN13: P5.5 U21.22 | length 4622.7
  Top Layer w10: U21.22@3702.4,2627.14 3800.8,2627.14 3825.92,2602.02 v1(3826,2602.02)
  Bottom Layer w10: P5.5@2492.62,-51.43 2492.62,267.21 2515.44,290.03 3937.37,290.03 4150.22,502.89 4150.22,2372 4150.22,2587.51 4135.8,2601.94 3826.08,2601.94 v1(3826,2602.02)
ANT: C74.1 L3.1 U16.3 | length 50.1
  Top Layer w12: C74.1@7684.87,3963.03 C74.1@7685.3,3962.6
  Top Layer w15: L3.1@7685.3,3913.07 C74.1@7685.3,3962.6
ANT#: C74.2 SB4.1 SB16.2
AUTO_FILL: J5.2 Q1.3
AUTO_FLUSH: J6.2 Q2.3
AUX_HEATER: C60.2 J13.1 Q21.3 R67.1 SB8.2
B_CNTRL: Q28.1 R75.1 U21.67 | length 2234.5
  Top Layer w10: R75.1@4060.1,248.03 4061.95,246.18 R75.1@4063.45,247.68 ; v1(4349.25,2141) 4372.47,2141 4383.59,2152.12 4383.59,2208.52 4368.93,2223.17 U21.67@4368.93,2275.56
  Top Layer w25: R75.1@4063.45,247.68 v2(4101.22,247.68)
  Bottom Layer w10: v2(4101.22,247.68) 4287.14,433.6 4287.14,2125.83 4302.31,2141 v1(4349.25,2141)
B_GND: P20.4 Q28.3 | length 182.3
  Top Layer w25: P20.4@3982.12,-51.43 3982.12,73.18 4019.45,110.51 4019.45,111 4022.21,113.75 Q28.3@4022.7,113.75
BAT: C2.2 C83.2 C84.2 C85.2 C87.2 J2.1 R120.1 R127.2 R149.2 U19.9
  other v2: 2390.82,539.67 2418.32,539.67 2390.82,567.67 2418.32,567.67 618.07,710.81 653.07,710.81 618.07,741.81 653.07,741.81 2975.87,819.03 3009.37,819.03 2975.87,852.03 3009.37,852.03
BOOT0: R16.1 U21.138 | length 576.6
  Top Layer w10: U21.138@3896.49,3116.51 3896.49,3247.33 3921,3271.84 v1(3921,3308) ; v1(4054,3484) 4054.25,3484.25 4054.25,3557.75 R16.1@4054.5,3558
  Bottom Layer w10: v1(3921,3308) 3921,3469.92 3935.08,3484 v1(4054,3484)
BT_ANT: ANT1.1 D13.2 U25.93 | length 1138.8
  Top Layer w20: 1760.87,4433.03 1760.87,3507.57 ccw(c1814.1,3507.57) 1762.9,3493 ccw(c1814.1,3507.57) 1799.54,3456.36 ccw(c1814.1,3507.57) 1814.1,3454.33 U25.93@1943.82,3454.33
BUZZER: R62.2 U21.82 | length 3467.7
  Top Layer w10: U21.82@4543.34,2528.71 4697.87,2528.71 4818.66,2649.5 4912.36,2649.5 7008.61,2649.5 7060.87,2701.76 7060.87,3419.87 7101.43,3460.44 R62.2@7204.48,3460.44
CE: Q39.1 U21.13 | length 5364.3
  Top Layer w10: v1(3693.67,2284.42) 3693.67,2223.28 3676.72,2206.34 3345.69,2206.34 3306,2246.03 3306,2744.68 3338.19,2776.87 3579.58,2776.87 3604.84,2802.13 3671.07,2802.13 3672.73,2803.79 3701.88,2803.79 U21.13@3702.4,2804.3
  Top Layer w25: v2(1742.76,1019.92) 1742.76,553.68 1767.56,528.88 Q39.1@1900.5,528.88
  Bottom Layer w10: v2(1742.76,1019.92) 1789.92,1019.92 1809.86,1039.86 1809.86,1760.74 1822.13,1773 3751.98,1773 3824.3,1845.32 3824.3,2127.83 3824.13,2128 3824.13,2150.95 v1@3692.16,2282.92
CII: R1.2 R2.2 U3.5 | length 178.7
  Top Layer w10: U3.5@2741.39,1304.3 2750.07,1304.3 2757.87,1312.1 R1.2@2757.87,1380.03
  Top Layer w20: R2.2@2654.98,1315.4 2711.59,1315.4 2722.69,1304.3 U3.5@2741.39,1304.3
CLK: D22.2 J30.5 R158.1 U21.74 | length 4312.5
  Top Layer w10: v1(4500.26,2371.23) U21.74@4543.34,2371.23
  Top Layer w15: D22.2@4061.46,4068.95 D22.2@4061.84,4068.56 D22.2@4069.37,4076.09 ; 4069.37,4080.09 J30.5@4069.37,4140.25 ; J30.5@4074.37,4140.25 J30.5@4074.84,4140.73
  Bottom Layer w10: v1(4028.54,4073.41) 4028.71,4073.24 4063.2,4073.24 4069.33,4079.37 4080.33,4090.37 4080.33,4133.48 4086.33,4139.48 4104.33,4139.48 4110.33,4133.48 4110.33,4092.03 4116.33,4086.03 4134.33,4086.03 4140.33,4092.03 4140.33,4114.53 4146.33,4120.53 4164.33,4120.53 4170.33,4114.53 4170.33,4092.03 4176.33,4086.03 4185.76,4086.03 4250.99,4086.03 4292.85,4044.18 4292.85,3639.58 4330.61,3601.81 5430.7,3601.81 5478.6,3553.91 5478.6,2428.76 5423.35,2373.51 4625.67,2373.51 4613.18,2361.02 4575.41,2361.02 4565.2,2371.23 v1(4500.26,2371.23)
CMD: D21.2 J30.3 R157.1 U21.76 | length 4312.5
  Top Layer w10: v1(4500.26,2410.6) U21.76@4543.34,2410.6
  Top Layer w15: D21.2@4160.65,3995.28 D21.2@4160.84,3995.08 ; J30.3@4161.46,4140.73 4161.65,4140.53 D21.2@4161.65,3999.28
  Bottom Layer w10: v1@4131.84,3994.79 4248.71,3994.79 4258.38,3985.13 4258.38,3625.96 4316.53,3567.81 5416.61,3567.81 5444.6,3539.82 5444.6,3114.79 5444.6,2442.84 ; v1(4500.26,2410.6) 4555.7,2410.6 4571.92,2426.83 4612.99,2426.83 4632.1,2407.72 5409.47,2407.72 5444.6,2442.84 ; 5444.6,2788.33 5444.6,2442.84
  other v1: 4131.55,3995.08
CRNT_SNS.IP+_1: D25.2 J3.2 U1.1 U1.2 | length 202
  Top Layer w30: J3.2@357.92,1461.02 511.35,1461.02 544.98,1427.39 D25.2@544.98,1426.4
  other v2: 1385,1423 1413.83,1423 1385,1451.93 1413.83,1451.93 1385,1480.86 1413.83,1480.86
CRNT_SNS.IP+_2: D26.2 J4.2 U2.1 U2.2 | length 207.4
  Top Layer w30: J4.2@357.92,1948.07 515.3,1948.07 549.98,1913.39 D26.2@549.98,1912.4
  other v2: 1382,1897 1410.83,1897 1382,1925.93 1410.83,1925.93 1382,1954.86 1410.83,1954.86
CRNT_VOUT.VIOUT1: C11.1 R5.2 R7.1 U21.28 | length 3494.3
  Top Layer w10: v1(3613.9,2526.8) 3631.67,2509.03 U21.28@3702.4,2509.03
  Bottom Layer w10: v2(1740.87,1215.03) 1771.19,1215.03 1787.86,1231.7 1787.86,1768.26 1811.6,1792 3746.94,1792 3806.3,1851.36 3806.3,2017.63 3806.13,2017.8 3806.13,2134.04 3614.15,2326.03 3614.15,2526.55 v1(3613.9,2526.8)
CRNT_VOUT.VIOUT2: C19.1 R8.2 R10.1 U21.29 | length 3027.9
  Top Layer w10: v1(3587.34,2498.19) 3618.47,2498.19 3627.31,2489.34 U21.29@3702.4,2489.34
  Bottom Layer w10: v2(1740.87,1685.51) 1740.87,1799.11 1752.76,1811 3741.9,1811 3788.3,1857.4 3788.3,2010.18 3788.13,2010.34 3788.13,2128 3659.57,2256.57 3587.34,2328.8 v1(3587.34,2498.19)
DAT0: D23.2 J30.7 R159.1 U21.75 | length 4312.4
  Top Layer w10: U21.75@4543.34,2390.92 v1@4590.28,2390.92
  Top Layer w15: D23.2@3979.92,4068.86 D23.2@3980,4068.78 ; J30.7@3988.23,4140.73 3988.31,4140.65 D23.2@3988.31,4072.78
  Bottom Layer w10: v1(3950.7,4068.78) 3972.89,4046.59 4028.55,4046.59 4029.64,4046.59 4029.81,4046.43 4045.12,4046.43 4045.28,4046.59 4063.03,4046.59 4063.54,4047.11 4069.59,4041.16 4069.76,4019.68 4075.81,4013.72 4093.81,4013.87 4099.76,4019.92 4099.42,4062.79 4105.37,4068.84 4123.37,4068.99 4129.42,4063.03 4129.7,4027.89 4135.75,4021.94 4153.75,4022.09 4159.7,4028.14 4159.42,4062.79 4165.37,4068.84 4183.37,4068.99 4189.42,4063.03 4189.68,4031.16 4195.72,4025.21 4213.72,4025.35 4219.68,4031.4 4219.45,4059.76 4225.4,4065.81 4237.55,4065.81 4246.81,4065.81 4275.85,4036.77 4275.85,3632.53 4323.57,3584.81 5423.65,3584.81 5461.6,3546.86 5461.6,2435.8 5416.51,2390.72 v1(4590.48,2390.72)
DAT3: D20.2 J30.2 R156.1 U21.73 | length 4312.4
  Top Layer w10: U21.73@4543.34,2351.55 4587.45,2351.55 v1(4613,2326)
  Top Layer w15: J30.2@4204.77,4140.73 4204.96,4140.53 D20.2@4204.96,4072.82 ; D20.2@4204.81,4068.97 4204.96,4068.82 D20.2@4205,4068.78 ; D20.2@4204.96,4068.78 4205.35,4068.39 4248.31,4068.39 4248.92,4069 v1(4310,4069)
  Bottom Layer w10: v1@4310,4073 4310,3646.46 4337.65,3618.81 4676.37,3618.81 4711.27,3618.81 4717.27,3624.81 4717.27,3642.44 4723.27,3648.44 4741.27,3648.44 4747.27,3642.44 4747.27,3624.81 4753.27,3618.81 4771.27,3618.81 4777.27,3624.81 4777.27,3695.89 4783.27,3701.89 4801.27,3701.89 4807.27,3695.89 4807.27,3624.81 4813.27,3618.81 4831.27,3618.81 4837.27,3624.81 4837.27,3695.89 4843.27,3701.89 4861.27,3701.89 4867.27,3695.89 4867.27,3624.81 4873.27,3618.81 4908.28,3618.81 5437.74,3618.81 5495.6,3560.95 5495.6,2421.72 5430.39,2356.51 4643.51,2356.51 v1(4613,2326)
DRV_OUTA1: R24.2 U6.7 | length 1585.2
  Top Layer w20: R24.2@1368.26,1145.64 1132.6,1145.64 1099.87,1178.38 1099.87,1343.03 1099.87,2190.03 1137.04,2227.21 U6.7@1376.09,2227.21
DRV_OUTB1: R25.2 U6.5 | length 1384.1
  Top Layer w20: v2(1046.59,1842) 1046.59,2291.62 1082.18,2327.21 U6.5@1376.09,2327.21 U6.5@1376.69,2327.81
  Top Layer w25: v2(1368,1607) 1368.87,1607.87 R25.2@1368.87,1675
  Bottom Layer w30: v2(1046.59,1842) 1046.59,1667.45 1107.04,1607 v2(1368,1607)
ENA: U12.2 U21.7 | length 2294.3
  Top Layer w10: U21.7@3702.4,2922.41 3702.69,2922.71 3789.71,2922.71 v1(3790,2923)
  Top Layer w15: U12.2@1892.46,2541.06 v2(1929.06,2541.06)
  Bottom Layer w10: v2(1929.06,2541.06) 1950,2562.01 1950,2819.35 1977.09,2846.44 3682.95,2846.44 3759.51,2923 v1(3790,2923)
ENA#: R85.1 U6.1 U6.8 U12.4 | length 663.6
  Top Layer w20: 1505.2,2176.21 1514.12,2176.21 1519.12,2181.21 1519.12,2558.78 1532.37,2572.03 U12.4@1783.67,2572.03
FILL_CNTRL: Q1.1 R69.1 U21.5 | length 3720.6
  Top Layer w10: U21.5@3702.4,2961.78 v1(3749,2961.78)
  Bottom Layer w10: v1(583,2395.44) 583,2837.94 608.5,2863.44 3674.9,2863.44 3746.43,2934.97 3746.43,2959.22 v1(3749,2961.78)
FLOW_MCU1: R76.1 U8.4 U21.79 | length 4126.7
  Top Layer w10: U21.79@4543.34,2469.66 4710.94,2469.66 4831.73,2590.44 4837.36,2590.44 6996.81,2590.44 7025.87,2561.39 7025.87,1111.8 7011.1,1097.03 6924.21,1097.03 U8.4@6899.51,1097.03
FLOW_MCU2: R35.1 U14.4 U21.78 | length 3343.4
  Top Layer w10: U21.78@4543.34,2449.97 4715.29,2449.97 4836.08,2570.76 4882.36,2570.76 6989.63,2570.76 7006.87,2553.52 7006.87,1794.23 6991.56,1778.92 6949.8,1778.92
FLOW_MCU3: R23.1 U15.4 U21.77 | length 2442.8
  Top Layer w10: U21.77@4543.34,2430.29 4723.82,2430.29 4844.61,2551.07 6834.84,2551.07 6858.44,2527.47 R23.1@6858.44,2459.75 ; U15.4@6922.43,2459.75 U15.4@6922.54,2459.86
FLOW_OUT1: J10.2 R77.1 U8.2
FLOW_OUT2: J16.2 R36.1 U14.2
FLOW_OUT3: J17.2 R38.1 U15.2
FLUSH_CNTRL: Q2.1 R70.1 U21.4 | length 3167.6
  Top Layer w10: v1(3654.25,2974.34) 3657.93,2974.34 3664.55,2980.96 3701.88,2980.96 U21.4@3702.4,2981.47
  Top Layer w20: Q2.1@619.75,2880.83 619.83,2880.91 Q2.1@622.01,2878.73
  Bottom Layer w10: v1@579.94,2880.61 666.24,2880.61 666.4,2880.44 3235.97,2880.44 3329.87,2974.34 v1(3654.25,2974.34)
  other v1: 579.94,2881
G_CNTRL: Q27.1 R74.1 U21.65 | length 2568.6
  Top Layer w10: Q27.1@3915.87,196.16 Q27.1@3918.6,198.89 ; U21.65@4329.56,2275.56 4329.56,2337.37 v1(4342.72,2350.53)
  Top Layer w25: v2(3918.6,166.03) Q27.1@3918.6,198.89
  Bottom Layer w10: v2(3918.6,166.03) 3957.62,166.03 4253.14,461.56 4253.14,2355.78 4263.41,2366.05 4327.21,2366.05 v1(4342.72,2350.53)
G_GND: P20.3 Q27.3 | length 166.1
  Top Layer w25: Q27.3@3881.2,114.25 3882.12,113.32 P20.3@3882.12,-51.43
GATE: Q20.4 U7.1
GATE_DRV.INA_1: U10.2 U21.59 | length 3509.6
  Top Layer w10: U21.59@4211.45,2275.56 4211.45,2402.99 v1(4252.67,2444.21)
  Top Layer w15: U10.2@1892.46,2189.85 v2(1930.87,2189.85)
  Bottom Layer w10: v2(1930.87,2189.85) 1984,2242.98 1984,2799.61 1996.53,2812.15 3754,2812.15 3777.85,2836 4215.39,2836 4235.95,2815.44 4235.95,2460.93 v1(4252.67,2444.21)
GATE_DRV.INB_1: U11.2 U21.60 | length 3357.2
  Top Layer w10: U21.60@4231.14,2275.56 4231.14,2369.29 v1@4283.01,2421.16
  Top Layer w15: U11.2@1892.87,2406.21 v2(1931.28,2406.21)
  Bottom Layer w10: v2(1931.28,2406.21) 1967,2441.93 1967,2809.48 1986.96,2829.44 3745.84,2829.44 3770.4,2854 4226.38,2854 4253.95,2826.43 4253.95,2480.85 4283.01,2451.79 v1(4283.01,2421.64)
GND: C1.2 C2.1 C3.2 C4.2 C5.1 C6.2 C7.2 C8.1 C9.2 C10.2 C11.2 C12.2 C13.1 C14.1 C15.1 C16.2 C17.2 C18.2 C19.2 C20.1 C21.2 C22.2 C23.2 C24.2 C25.2 C26.2 C27.2 C28.1 C29.2 C30.2 C31.2 C32.2 C33.2 C34.1 C35.1 C36.2 C37.1 C38.1 C39.2 C40.2 C41.1 C42.2 C43.2 C44.1 C45.2 C46.2 C47.2 C48.2 C49.2 C50.2 C51.2 C52.2 C53.1 C54.2 C55.2 C57.1 C58.2 C59.2 C60.1 C61.2 C62.2 C63.2 C64.2 C65.2 C66.2 C67.2 C68.2 C69.2 C70.2 C71.1 C72.1 C73.1 C76.2 C78.1 C79.1 C80.2 C81.1 C83.1 C84.1 C85.1 C88.1 C89.2 C90.1 C91.2 C92.1 C93.2 C94.2 C95.2 C97.1 C98.1 C99.1 C100.1 C101.2 C102.1 C103.2 C104.2 C105.2 C106.2 C107.1 C108.1 C109.2 C110.2 C111.2 C112.2 C113.2 C114.2 D1.2 D2.2 D3.1 D4.3 D5.1 D8.1 D9.1 D10.1 D12.2 D13.1 D16.2 D17.1 D18.3 D19.2 D20.1 D21.1 D22.1 D23.1 D24.1 D27.1 J1.3 J1.5 J1.9 J2.2 J10.3 J12.3 J13.3 J14.3 J14.4 J15.2 J15.3 J15.4 J15.5 J16.3 J17.3 J18.1 J19.5 J19.MH1 J19.MH2 J19.MH3 J19.MH4 J19.MP1 J19.MP2 J20.4 J21.2 J22.1 J22.2 J22.MP1 J22.MP2 J23.3 J24.6 J25.2 J25.3 J26.2 J26.3 J27.1 J27.2 J27.3 J27.4 J27.C5 J28.4 J29.4 J30.6 J30.S1 J30.S2 J30.S3 J30.S4 J30.SW-B L3.2 L4.2 LED11.2 P3.6 P4.6 P5.6 P6.3 P8.6 P10.1 Q1.2 Q2.2 Q3.2 Q4.2 Q5.2 Q6.2 Q8.2 Q9.2 Q10.2 Q11.2 Q12.2 Q13.2 Q14.2 Q15.2 Q16.2 Q18.2 Q19.2 Q22.2 Q23.2 Q25.2 Q26.2 Q27.2 Q28.2 Q29.2 Q30.2 Q31.2 Q33.2 Q38.2 Q40.2 Q43.2 R2.1 R4.2 R6.2 R7.2 R9.2 R10.2 R13.2 R26.2 R32.2 R34.2 R53.1 R61.2 R65.1 R66.1 R67.2 R69.2 R70.2 R72.2 R73.2 R74.2 R75.2 R83.2 R84.2 R86.1 R88.1 R91.1 R92.1 R97.2 R98.2 R103.2 R105.1 R113.1 R131.1 R133.1 R139.1 R142.1 R147.1 R148.2 R155.1 SB6.2 SB41.2 SB42.2 SW1.1 SW2.1 SW3.1 SW4.3 U1.5 U1.6 U2.5 U2.6 U3.4 U4.1 U6.3 U8.3 U9.2 U9.3 U10.3 U11.3 U12.3 U13.2 U14.3 U15.3 U16.2 U16.4 U16.9 U17.3 U18.3 U19.11 U20.3 U20.6 U21.16 U21.30 U21.31 U21.38 U21.51 U21.61 U21.71 U21.83 U21.94 U21.107 U21.120 U21.130 U21.143 U22.2 U23.2 U24.5 U25.2 U25.17 U25.18 U25.29 U25.39 U25.45 U25.46 U25.54 U25.58 U25.59 U25.61 U25.62 U25.63 U25.64 U25.65 U25.69 U25.70 U25.71 U25.72 U25.73 U25.74 U25.75 U25.76 U25.77 U25.78 U25.79 U25.80 U25.81 U25.82 U25.83 U25.84 U25.85 U25.86 U25.87 U25.88 U25.89 U25.91 U25.92 U25.94 U26.2 X1.2 X1.4 | length 6599.7
  Top Layer w7: U20.6@3495.55,817.03 3683.05,629.53 3742.84,629.53 3773.26,599.11 3773.26,598.16 3772.8,597.7 C91.2@3772.8,534.16
  Top Layer w8: U19.11@2315.54,692.67 2343.2,692.67 2352.87,702.34 v2(2352.87,721.03)
  Top Layer w10: J28.4@1135.6,3473.34 J28.4@1136.43,3474.17 ; v1@1194.17,3474.17 v1(1195,3475) ; C4.2@1505.16,1298.03 C4.2@1507.5,1300.37 ; U10.3@1892.46,2227.25 U10.3@1892.87,2227.66 ; U12.3@1892.46,2578.46 U12.3@1892.95,2578.95 ; U11.3@1892.87,2443.61 U11.3@1892.95,2443.68 ; C80.2@2383.71,808.69 C80.2@2383.87,808.53 ; C16.2@2594.98,1667.95 2624.43,1697.4 C16.2@2691.42,1697.4 ; v2(3070.87,1342.03) 3134.13,1342.03 D1.2@3152.87,1360.77 ; v1(3276.82,3901.99) C103.2@3300.41,3901.99 ; C106.2@3499,3789.81 3499.34,3789.47 3525.38,3789.47 v1(3525.72,3789.13) ; C104.2@3499,3923.81 v1@3525.03,3923.81 ; LED11.2@3535.34,440.03 LED11.2@3535.6,440.3 ; X1.4@3535.62,2650.61 X1.4@3537.32,2652.31 ; U21.16@3702.4,2745.25 v1(3759.39,2745.25) ; v1(3753.18,3222.5) C110.2@3778.38,3222.5 ; U21.38@3798.06,2275.56 3798.06,2226.29 3784.85,2213.07 3784.85,2184.03 3794.38,2174.5 3813.75,2174.5 C30.2@3817.75,2170.5 ; v1(3798.06,3053.42) U21.143@3798.06,3116.51 ; v1(4009.09,2442.9) 4009.17,2442.83 4009.17,2425.07 4053.97,2380.26 U21.51@4053.97,2275.56 4053.97,2236.81 4034.95,2217.79 ; J30.6@4031.27,4141 J30.6@4031.54,4140.73 ; C109.2@4034.28,3222.5 4038.28,3218.5 4042.61,3218.5 4074.63,3186.48 ; U21.130@4053.97,3116.51 4054.25,3116.23 4054.25,3052.41 v1(4054.53,3052.13) ; C29.2@4070.16,2170.5 C29.2@4073.66,2170.5 ; C95.2@4227.64,3222.5 C95.2@4231.14,3222.5 ; 4236.41,2215.64 4250.82,2230.05 U21.61@4250.82,2275.56 ; U21.120@4250.82,3116.51 4251.1,3116.23 4251.1,3052.41 v1(4251.38,3052.13) ; v1(4444.4,2170.5) 4444.4,2174.19 4436.04,2182.55 4436.04,2214.65 4447.67,2226.29 U21.71@4447.67,2275.56 ; v1(4476,2790.13) 4501.2,2764.93 U21.94@4543.34,2764.93 ; v1(4495,3020.84) U21.107@4543.34,3020.84 ; v1(4495.05,2548.4) U21.83@4543.34,2548.4 ; C33.2@4635.03,2724.72 C33.2@4635.03,2724.82 ; v1(4664.5,3015.33) C93.2@4664.5,3040.52 C112.2@4664.5,3079 ; C32.2@4677.63,2609.36 C32.2@4677.97,2609.36 ; Q16.2@4719.36,774.29 Q16.2@4719.47,774.4 ; C59.2@5001.64,1094.03 C59.2@5001.87,1094.26 ; J22.MP2@5220.24,2350.68 J22.MP2@5220.88,2351.31 ; D8.1@5248.34,4046.42 D8.1@5272.47,4070.55 ; SW1.1@5517,4088.44 SW1.1@5518.87,4086.57 ; C45.2@5674.87,1096.03 C45.2@5675.87,1095.03 ; SW3.1@6489.55,4088.44 SW3.1@6489.87,4088.12 ; C70.2@6938.87,3961.03 C70.2@6939.37,3960.54 ; D12.2@7010.76,704.89 D12.2@7010.87,704.77 ; C40.2@7092.99,546.03 C40.2@7092.99,546.03 ; R66.1@7197.88,546.15 R66.1@7197.99,546.03 ; Q38.2@7221.27,729.66 Q38.2@7221.38,729.78
  Top Layer w15: Q33.2@742.89,435.03 Q33.2@737.21,435.03 ; Q33.2@742.89,436.86 Q33.2@748.42,436.86 ; Q33.2@750.25,435.03 752.22,437 v2@766.67,437 ; U13.2@909.82,397.63 750.52,397.63 741.23,406.92 741.23,431.01 Q33.2@737.21,435.03 ; U22.2@1230.87,4113.22 v2(1230.87,4146.03) ; v2(2315.54,790.67) 2317.88,790.67 2335.74,808.53 2378.87,808.53 2379.03,808.69 C80.2@2383.71,808.69 ; v2(2524,918) 2541.16,900.84 U18.3@2541.16,824.67 ; LED11.2@3535.34,440.56 LED11.2@3535.6,440.3 ; C30.2@3817.75,2170.5 3819.25,2169 C30.2@3822.75,2169 ; v1@3860.35,2135.31 3862,2133.66 v1@3863.65,2135.31 ; C36.2@3912.67,2170.5 C36.2@3916.17,2170.5 R13.2@3955.54,2170.5 ; C21.2@4114.81,1399.48 4114.81,1428.16 C21.2@4146.68,1460.03 ; C33.2@4635.03,2724.72 4635.14,2724.72 v1(4643.87,2715.98) ; C32.2@4677.97,2609.36 4677.97,2609.16 4709.12,2578.01 v1(4709.25,2578.01) ; C50.2@7547.87,4012.59 7686.26,4012.59 7697.98,4024.31 J15.4@7697.98,4092.4 ; L3.2@7683.85,3885.14 7684.22,3885.51 L3.2@7685.3,3885.51 ; v2(7684.85,3854.53) L3.2@7684.85,3885.14 ; v2(7795.87,3794.05) 7906.92,3794.05 7917.36,3804.49 L4.2@7917.36,3854.03 ; Q33.2@737.21,435.03 735.24,435.03 Q33.2@735.24,437 Q33.2@737.21,435.03
  Top Layer w20: v2(1211.87,2276.03) C55.2@1245.87,2276.03 ; v2@1283.91,951.4 v2(1288.91,951.4) C1.2@1350.25,951.4 ; v1(1344.37,3711.4) 1376.05,3679.71 1376.05,3652.47 1378.1,3650.41 1378.1,3627.14 1384.25,3621 D18.3@1385.37,3621 ; 1740.87,1630.29 C18.2@1777.5,1630.29 ; 1741.87,1165.29 C6.2@1778.5,1165.29 ; v2@1856.35,2227.18 U10.3@1892.39,2227.18 ; v2@1856.35,2578.39 U12.3@1892.39,2578.39 ; v2@1856.76,2443.53 U11.3@1892.8,2443.53 ; U12.3@1891.56,2580.27 1892.89,2578.95 U12.3@1892.95,2578.95 ; R2.1@2594.98,1315.4 v1(2594.98,1352.03) ; v1(3065.6,3332.27) C97.1@3065.6,3356.75 ; Q23.2@3239,3347.34 v1(3239,3365.2) ; v1(3346.6,3332.27) C102.1@3346.6,3356.75 ; v1(3391.54,3332.27) D19.2@3391.54,3350.13 ; J19.MH2@3526.96,4579.07 J19.5@3565.94,4579.07 ; X1.4@3537.32,2656.31 3572.56,2656.31 v2(3583,2645.86) ; 3903.48,1370.11 3903.48,1386.35 3916.86,1399.73 3933.1,1399.73 3933.1,1406.03 3946.47,1419.41 4023.83,1419.41 ; v2(5085.18,770.31) 5085.88,769.61 5085.88,749.84 5090.47,745.25 Q18.2@5090.47,741.73 ; v2(5758.32,774.38) 5759.02,773.69 5759.02,759.14 5774.47,743.7 Q31.2@5774.47,741.73
  Top Layer w22: U24.5@4985.78,3884.35 U24.5@4984.62,3885.51 5024.34,3885.51 5046.87,3862.99 5046.87,3668.53